# Altium PCB Battery Bank_PCB.PcbDoc (part 1 of 3)
Units mil, origin at the board's own origin, x right, y up, seen from the top; angles counter-clockwise.
Board outline 724.09 x 1004.05 mil, 4 copper layers (Top Layer, Layer 1, Layer 2, Bottom Layer), stack 28.803 mil thick; 96 components, 54 nets, 300 pads, 157 vias.
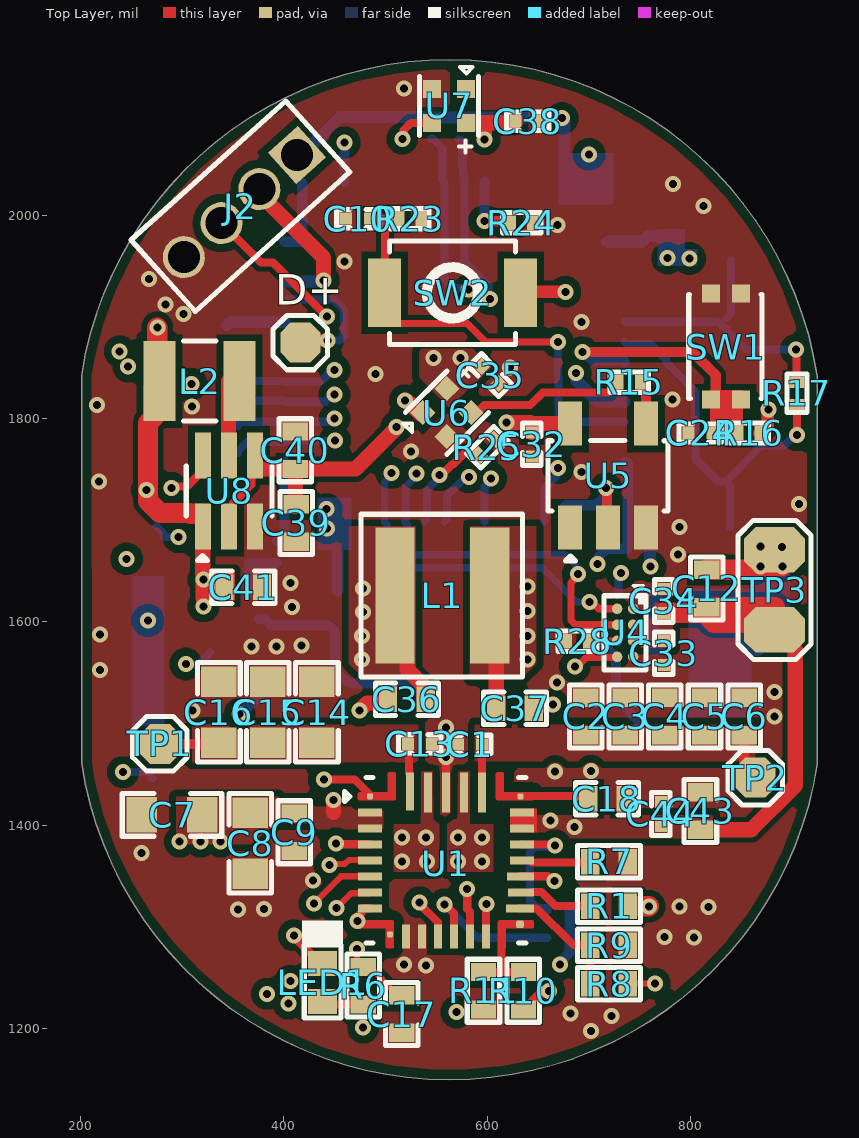
[diagram p0: Top Layer view]
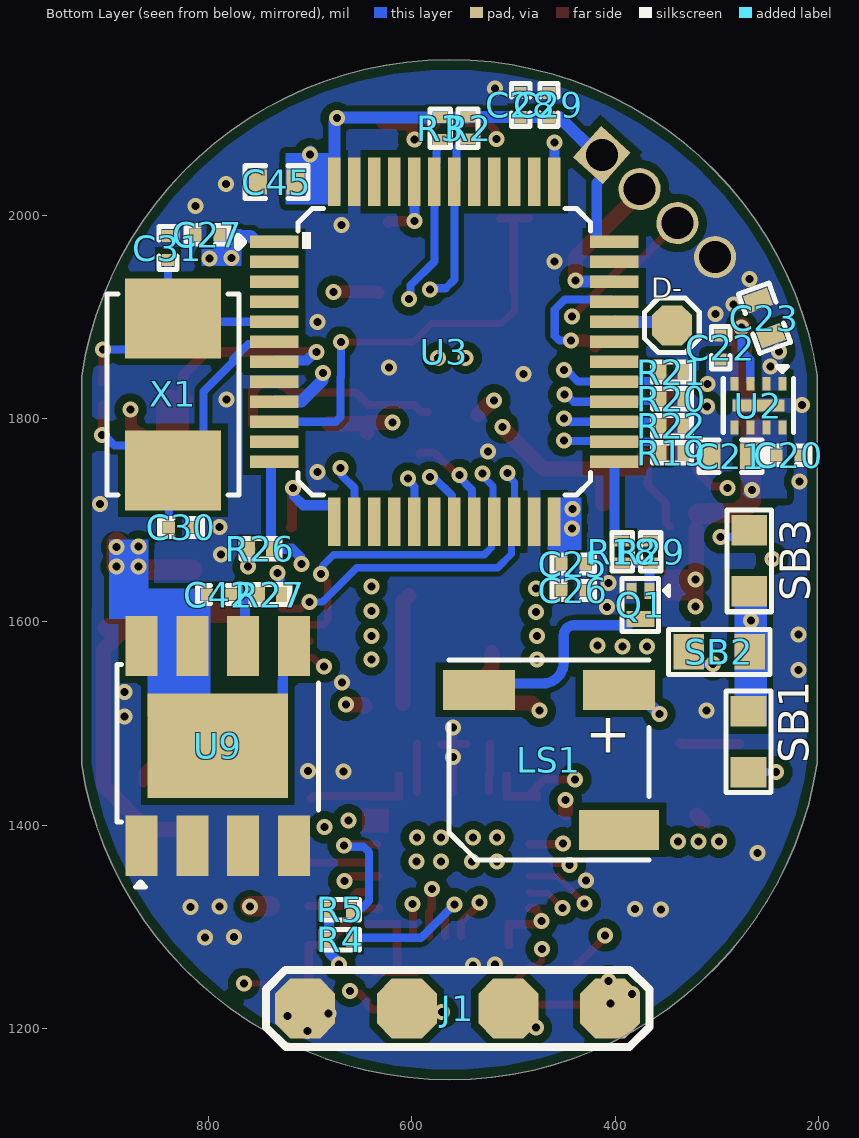
[diagram p1: Bottom Layer view, seen from below]
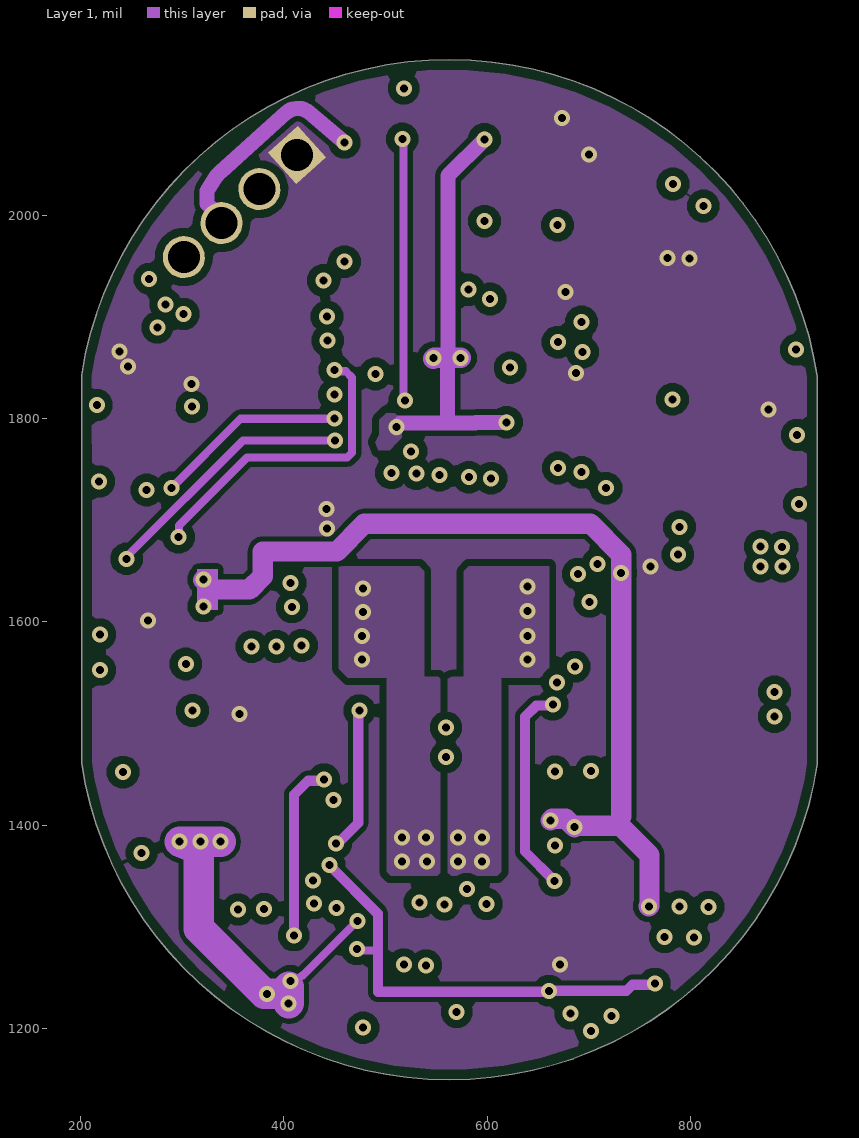
[diagram p2: Layer 1]
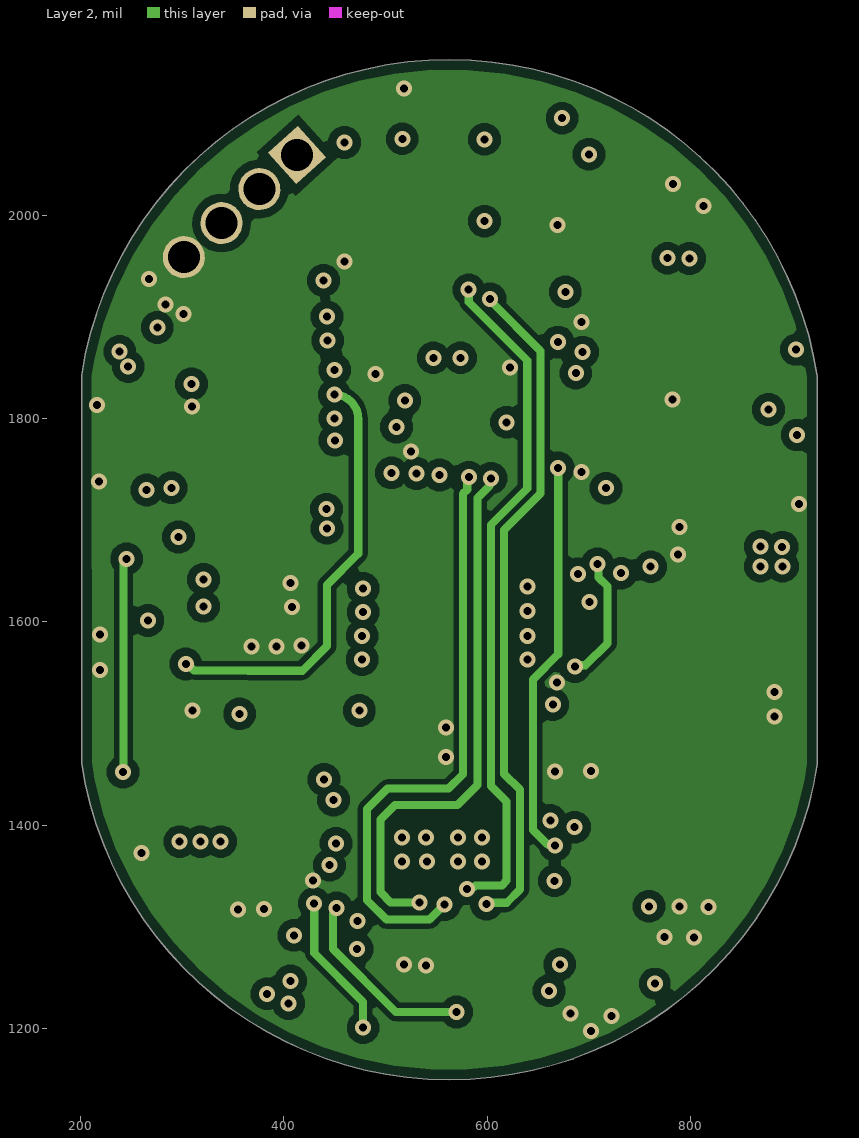
[diagram p3: Layer 2]
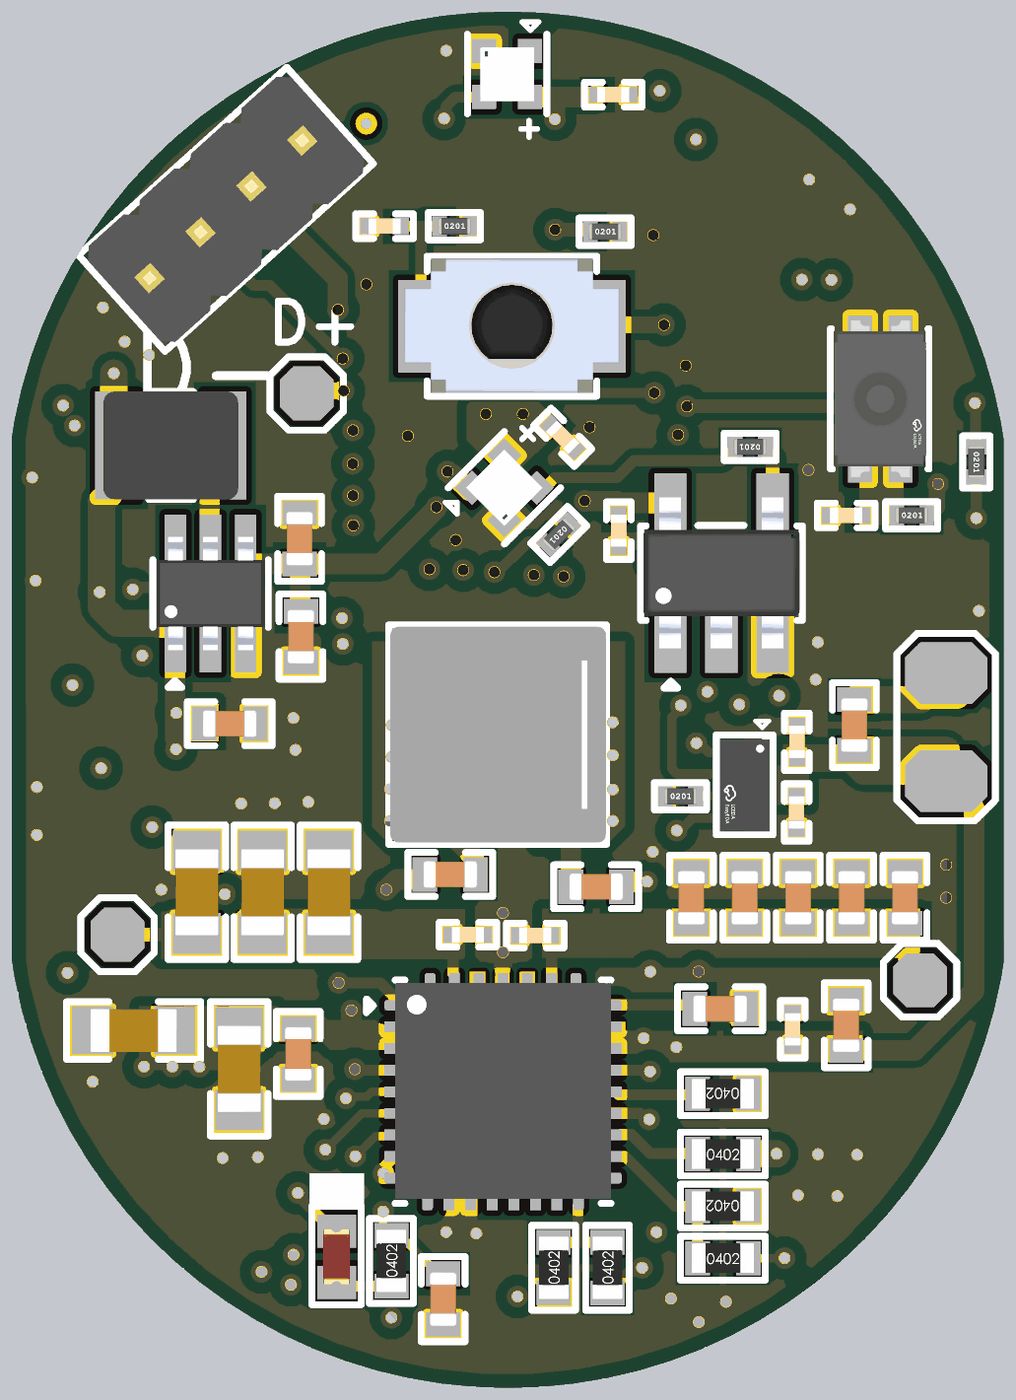
[diagram p5: 3D render of the assembled board from above, using the file's embedded part models]
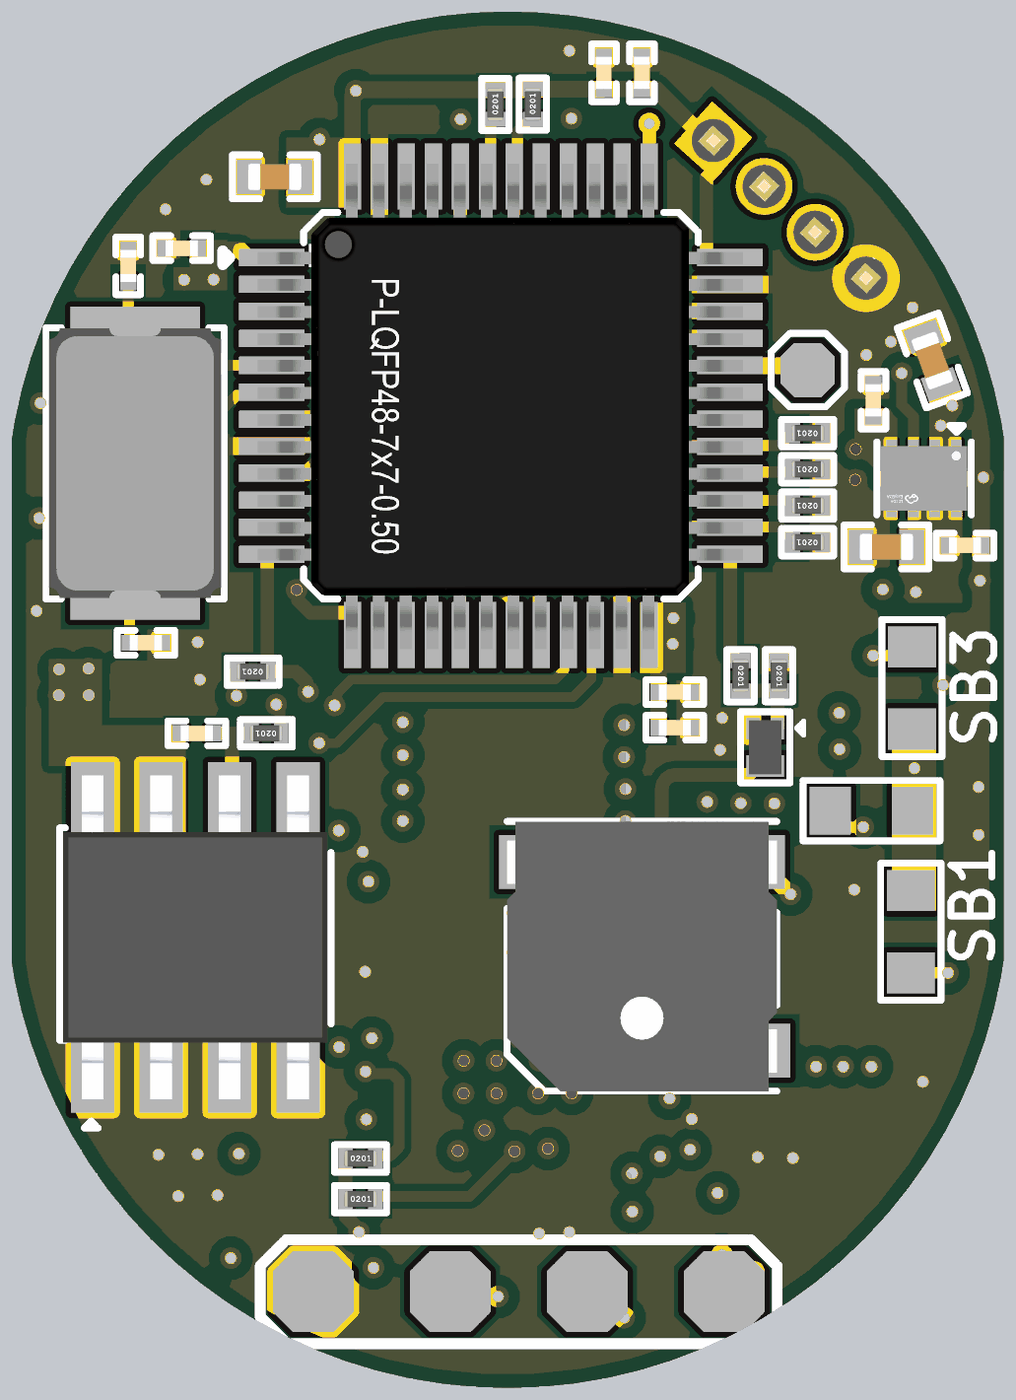
[diagram p6: 3D render of the assembled board from below, using the file's embedded part models]

## Layer stack, top to bottom
Top Solder: solder mask 0.4, Solder Resist, Dk 3.5
Top Layer: signal copper 1.378
Dielectric 2: prepreg 8.2835, PP-006, Dk 4.1
Layer 1: signal copper 0.5984
Dielectric 1: dielectric 8.2835, FR-4, Dk 4.8
Layer 2: signal copper 0.5984
Dielectric 3: prepreg 8.2835, PP-006, Dk 4.1
Bottom Layer: signal copper 1.378
Bottom Solder: solder mask 0.4, Solder Resist, Dk 3.5

## Board outline
201.03,1461.11 200.91,1842.93 cw(c562.81,1787.35) 924.87,1841.82 925,1460 cw(c563.1,1515.58)

## Design rules (kind name [scope] priority, off if disabled: settings)
BoardOutlineClearance [All] p1: gap=0 ignorepadtopadclearanceinfootprint=FALSE except(1: THPad-OutlineEdge THPad-CavityEdge THPad-CutoutEdge THPad-SplitBarrior THPad-SplitContinuation; 5: Via-OutlineEdge Via-CavityEdge Via-CutoutEdge Via-SplitBarrior Via-SplitContinuation; 10: Poly-OutlineEdge)
Clearance [All] p1: gap=10 ignorepadtopadclearanceinfootprint=TRUE except(0: Arc-Hole Track-Hole SMDPad-Hole THPad-Hole Via-Hole Fill-Hole Poly-Hole Region-Hole Text-Hole; 5: Arc-Arc Arc-Track Arc-SMDPad Arc-Via Arc-Poly Track-Track Track-SMDPad Track-Via Track-Poly SMDPad-SMDPad SMDPad-Region SMDPad-Text Fill-Poly; 6: SMDPad-Via SMDPad-Fill Via-Via Text-Text; 7: Arc-Fill Arc-Region Track-Fill Track-Region SMDPad-THPad SMDPad-Poly Fill-Fill Fill-Region Poly-Poly; 8: THPad-Via THPad-Poly Via-Poly)
MinimumSolderMaskSliver [All] p1: minsoldermaskwidth=1
PlaneConnect [All] p1: planeconnectstyle=Direct reliefexpansion=20 reliefentries=4 reliefconductorwidth=10 reliefairgap=10
PolygonConnect [All] p1: connectstyle=Direct reliefconductorwidth=10 reliefentries=4 polygonreliefangle="90 Angle" airgapwidth=10
RoutingVias [All] p1: holewidth=7.87 width=15.75 viastyle="Through Hole" minholewidth=7.87 minwidth=15.75 maxholewidth=7.87 maxwidth=15.75
SilkToSilkClearance [All] p1: silktosilkclearance=1
SilkToSolderMaskClearance [IsPad] p1: minsilkscreentomaskgap=1 clearancetoexposedcopper=TRUE
SolderMaskExpansion [All] p1: expansion=4 istentingtop=FALSE
Width [All] p1: maxlimit=30 minlimit=5 preferedwidth=10 midlayer1_minwidth=8 midlayer2_minwidth=8 minimp=50.000000 maximp=50.000000 favimp=50.000000
26 further rules are at their usual default settings.

## Classes and differential pairs
component class power_Sheet: C1 C2 C3 C4 C5 C6 C7 C8 C9 C12 C13 C14 C15 C16 C17 C18 C20 C21 C22 C23 C36 C37 C39 C40 C41 C42 C43 C44 J1 L1 L2 LED1 R1 R2 R3 R4 R5 R6 R7 R8 R9 R10 R11 R27 TP1 TP2 TP3 U1 U2 U8 U9
component class Controller_Sheet: C10 C24 C25 C26 C27 C28 C29 C30 C31 C32 C33 C34 C35 C38 C45 D+ D- J2 LS1 Q1 R15 R16 R17 R18 R19 R20 R21 R22 R23 R24 R25 R26 R28 R29 SB1 SB2 SB3 SW1 SW2 U3 U4 U5 U6 U7 X1

## Components (designator, comment, footprint, x,y, rotation, side; value= is the part's Value field where it differs from the comment)
C1 "0.1uF" CAP-0201 583,1479.5 r0 top
C2 "10uF" Cap-0402 697,1507 r270 top
C3 "10uF" Cap-0402 736,1507 r270 top
C4 "10uF" Cap-0402 775,1507 r270 top
C5 "10uF" Cap-0402 814,1507 r270 top
C6 "10uF" Cap-0402 853,1507 r270 top
C7 "10uF" CAP-0603 289.87,1410.11 r0 top
C8 "10uF" CAP-0603 366.92,1382.11 r90 top
C9 "100nF" cap-0402 410,1393 r90 top
C10 "1uF" CAP-0201 473,1997 r180 top
C12 "10uF" Cap-0402 816,1633 r270 top
C13 "0.1uF" CAP-0201 533.81,1480 r180 top
C14 "10uF" CAP-0603 432.5,1511 r270 top
C15 "10uF" CAP-0603 384,1511 r270 top
C16 "10uF" CAP-0603 336,1511 r270 top
C17 "4.7uF" Cap-0402 515.82,1214.09 r270 top
C18 "1nF" Cap-0402 718,1426 r180 top
C20 "2.2uF" CAP-0201 229.19,1764 r0 bottom
C21 "10uF" Cap-0402 286.5,1763 r180 bottom
C22 "2.2uF" CAP-0201 296,1870 r270 bottom
C23 "10uF" Cap-0402 253,1899 r250 bottom
C24 "1uF" CAP-0201 810,1786 r180 top
C25 "0.1uF" CAP-0201 441,1657 r0 bottom
C26 "0.1uF" CAP-0201 441,1631 r0 bottom
C27 "0.1uF" CAP-0201 801,1981 r180 bottom
C28 "0.1uF" CAP-0201 492.8,2108.91 r270 bottom
C29 "2.2uF" CAP-0201 465,2108.91 r90 bottom
C30 "30pF" Cap-0201 827.13,1693 r0 bottom
C31 "30pF" Cap-0201 840,1968.06 r270 bottom
C32 "0.1uF" CAP-0201 644,1774.81 r90 top
C33 "0.1uF" CAP-0201 773.88,1569.26 r270 top
C34 "1uF" CAP-0201 774,1620.74 r90 top
C35 "0.1uF" CAP-0201 603,1843 r135 top
C36 "47nF" Cap-0402 521,1524 r0 top
C37 "47nF" Cap-0402 627.5,1515 r0 top
C38 "0.1uF" CAP-0201 640,2093 r180 top
C39 "4.7uF" Cap-0402 412,1697.5 r90 top
C40 "4.7uF" Cap-0402 411,1769 r90 top
C41 "10uF" Cap-0402 360,1634 r180 top
C42 "0.1uF" CAP-0201 790,1627 r180 bottom
C43 "10uF" Cap-0402 810,1414 r270 top
C44 "0.1uF" CAP-0201 771,1411 r270 top
C45 "4.7uF" Cap-0402 733,2033 r180 bottom
D+ "TEST POINT 0.5mm Dia" "Test-point - 0.5mm" 416.19,1874.95 r0 top
D- "TEST POINT 0.5mm Dia" "Test-point - 0.5mm" 344,1892 r180 bottom
J1 "4 Pin SMD Wire Connector" "4 Pin SMD Wire CON." 404.97,1219.55 r0 bottom
J2 "ZX-PZ1.27-1-4PZZ" ZX-PZ1.27-1-4PZZ 357.21,2009.31 r222 top
L1 "1uH" XFL4020-102MEC 556,1626 r0 top
L2 "4.7uH" SLO252012F4R7MTT 317,1837 r0 top
LED1 "Green" LED-0402 438,1245 r90 top
LS1 "FUET-5025" FUET-5025 465,1464.27 r0 bottom
Q1 "RV2C010UNT2L" DFN1006-3 375,1616.78 r0 bottom
R1 "100R" Res-0402 720,1320 r0 top
R2 "4.7K" Res-0201 544.68,2086.09 r90 bottom
R3 "4.7K" Res-0201 572,2085.83 r90 bottom
R4 "10K" Res-0201 670.43,1287.13 r180 bottom
R5 "10K" Res-0201 670.43,1316.72 r180 bottom
R6 "2.2K" Res-0402 478,1242 r90 top
R7 "3K" Res-0402 720,1364 r180 top value=3kR
R8 "137K" Res-0402 720,1244 r0 top value=137kR
R9 "100K" Res-0402 720,1282 r180 top
R10 "5.23K" Res-0402 635.78,1237 r90 top value=5.23kR
R11 "30.1K" Res-0402 596.46,1237 r90 top
R15 "499R" Res-0201 740,1836 r180 top
R16 "10K" Res-0201 857.83,1786 r0 top
R17 "1M" Res-0201 905,1825 r270 top value=1MR
R18 "100R" Res-0201 393,1669 r270 bottom
R19 "10K" Res-0201 344,1766.42 r0 bottom
R20 "10K" Res-0201 344,1819.67 r0 bottom
R21 "10K" Res-0201 344,1846 r0 bottom
R22 "10K" Res-0201 344,1793.1 r0 bottom
R23 "5.1K" Res-0201 524,1997 r0 top value=5.1kR
R24 "10K" Res-0201 634,1993 r0 top
R25 "10K" Res-0201 600.18,1772.02 r225 top
R26 "10K" Res-0201 749,1672 r0 bottom
R27 "1K" Res-0201 739.17,1627 r0 bottom value=1kR
R28 "10K" Res-0201 689,1581 r0 top
R29 "10K" Res-0201 365,1669 r270 bottom
SB1 "Solder Bridge 0603" "Solder Bridge" 268.65,1482.17 r270 bottom
SB2 "Solder Bridge 0603" "Solder Bridge" 297.47,1570.48 r0 bottom
SB3 "Solder Bridge 0603" "Solder Bridge" 267.87,1660.06 r90 bottom
SW1 "HX TS152605A" "HX TS152605A 160gf" 835,1871 r90 top
SW2 "B3U-1000P" B3U-1000P 566,1924 r180 top
TP1 "TEST POINT 0.5mm Dia" "Test-point - 0.5mm" 278,1480 r90 top
TP2 "TEST POINT 0.5mm Dia" "Test-point - 0.5mm" 864,1446.77 r90 top
TP3 "2 Test Pad" "2 Test Pad" 883,1592.26 r90 top
U1 "BQ25792RQMR" "29-VQFN-HR (4x4)" 559.5,1362 r0 top
U2 "LD56100DPU33R" DFN-8(1.2x1.6) 259,1813 r270 bottom
U3 "STM32F103C8T6" "48-LQFP (7x7)_" 568,1866 r180 bottom
U4 "MAX17048X+T10" "8-WLP (1.66x0.92)" 735.87,1589.38 r270 top
U5 "SN74LV1T34DBVR" SOT-23-5 719,1744 r90 top
U6 "XL-1010RGBC-WS2812B" XL-1010RGBC-WS2812B 560.52,1806.12 r45 top
U7 "XL-1010RGBC-WS2812B" XL-1010RGBC-WS2812B 562.52,2108 r270 top
U8 "TPS61222DCKR" SC-70-6 346,1729 r90 top
U9 "XB8886A" 8-SO-EP_ 791,1478 r90 bottom
X1 "8MHz" 0153G2-8.000F20DTNJL 835,1824 r270 bottom

## Footprints (in the part's own frame and the unit in brackets; to place one, negate y for a bottom-side part, rotate by r counter-clockwise, add the part's x,y. Pads: shape width x height; smd on the part's side, far side on the other; paste and mask are expansions set on the pad)
"2 Test Pad" [mil]
  oct 45x60 smd: 1(0,0) 2(78.74,0)
  silkscreen extent -29,-36 108,36
"4 Pin SMD Wire CON." [mm]
  oct 1.5x1.5 smd: 1(0,0) 2(2.54,0) 3(5.08,0) 4(7.62,0)
  silkscreen extent -0.98,-0.97 8.6,0.97
8-SO-EP_ [mm]
  rect 1.505x0.802 smd: 1(-2.497,1.905) 2(-2.497,0.635) 3(-2.497,-0.635) 4(-2.497,-1.905) 5(2.498,-1.905) 6(2.498,-0.635) 7(2.498,0.635) 8(2.498,1.905)
  rect 2.613x3.502 smd: 9(0,0)
  silkscreen extent -3.53,-2.51 2.03,2.51, body extent -3,-2.45 3,2.45, height 1.7
"8-WLP (1.66x0.92)" [mm]
  round 0.26 smd paste-100 mask+0.051: A1(-0.6,0.2) A2(-0.2,0.2) A3(0.2,0.2) A4(0.6,0.2) B1(-0.6,-0.2) B2(-0.2,-0.2) B3(0.2,-0.2) B4(0.6,-0.2)
  silkscreen extent -1.18,-0.53 0.93,0.53, body extent -0.84,-0.46 0.84,0.46, height 0.58
"29-VQFN-HR (4x4)" [mm]
  rrect50% 0.15x0.15 smd: 1(-1.9,1.687) 9(-1.4,-1.762) 24(1.863,1.687)
  rect 0.6x0.2 smd: 2(-1.9,1.288) 3(-1.9,0.888) 4(-1.9,0.487) 5(-1.9,0.088) 6(-1.9,-0.312) 7(-1.9,-0.713) 8(-1.9,-1.112) 20(1.9,0.088) 21(1.9,0.487) 22(1.9,0.888) 23(1.9,1.288)
  rect 0.2x0.6 smd: 10(-1,-1.812) 11(-0.6,-1.812) 12(-0.2,-1.812) 13(0.2,-1.812) 14(0.6,-1.812) 15(1,-1.812)
  rrect50% 0.19x0.19 smd: 16(1.85,-1.512)
  rect 0.7x0.2 smd: 17(1.85,-1.112)
  rect 0.65x0.2 smd: 18(1.875,-0.713)
  rect 0.68x0.2 smd: 19(1.863,-0.312)
  rect 0.2x1 smd: 25(0.9,1.787) 26(0.45,1.787) 27(0,1.787) 28(-0.45,1.787)
  rect 0.2x0.95 smd: 29(-0.9,1.813)
  Top Layer region: -1.292,2.287 -1.29,2.287 -1.287,2.285 -1.285,2.285 -1.282,2.285 -1.28,2.284 -1.277,2.282 -1.275,2.281 -1.273,2.28 -1.271,2.278 -1.269,2.277 -1.267,2.275 -1.265,2.272 -1.263,2.271 -1.261,2.268 -1.26,2.267 -1.258,2.265 -1.257,2.262 -1.255,2.261 -1.254,2.258 -1.253,2.255 -1.252,2.252 -1.252,2.251 -1.251,2.248 -1.251,2.245 -1.25,2.242 -1.25,2.241 -1.25,2.238 -1.25,1.637 -1.25,1.635 -1.25,1.633 -1.251,1.63 -1.251,1.627 -1.252,1.625 -1.252,1.623 -1.253,1.62 -1.254,1.617 -1.255,1.615 -1.257,1.613 -1.258,1.61 -1.26,1.609 -1.261,1.606 -1.263,1.605 -1.265,1.603 -1.267,1.6 -1.269,1.599 -1.271,1.597 -1.273,1.596 -1.275,1.595 -1.277,1.593 -1.28,1.592 -1.282,1.59 -1.285,1.59 -1.287,1.59 -1.29,1.589 -1.292,1.589 -1.295,1.587 -2.155,1.587 -2.158,1.589 -2.16,1.589 -2.163,1.59 -2.165,1.59 -2.168,1.59 -2.17,1.592 -2.173,1.593 -2.175,1.595 -2.177,1.596 -2.179,1.597 -2.181,1.599 -2.183,1.6 -2.185,1.603 -2.187,1.605 -2.189,1.606 -2.19,1.609 -2.192,1.61 -2.193,1.613 -2.195,1.615 -2.196,1.617 -2.197,1.62 -2.198,1.623 -2.198,1.625 -2.199,1.627 -2.199,1.63 -2.2,1.633 -2.2,1.635 -2.2,1.637 -2.2,1.737 -2.2,1.74 -2.2,1.743 -2.199,1.746 -2.199,1.747 -2.198,1.75 -2.198,1.753 -2.197,1.756 -2.196,1.757 -2.195,1.76 -2.193,1.763 -2.192,1.764 -2.19,1.767 -2.189,1.769 -2.187,1.77 -2.185,1.773 -2.183,1.774 -2.181,1.777 -2.179,1.777 -2.177,1.78 -2.175,1.78 -2.173,1.783 -2.17,1.784 -2.168,1.784 -2.165,1.786 -2.163,1.786 -2.16,1.787 -2.158,1.787 -2.155,1.787 -1.45,1.787 -1.45,2.238 -1.45,2.241 -1.45,2.242 -1.449,2.245 -1.449,2.248 -1.448,2.251 -1.448,2.252 -1.447,2.255 -1.446,2.258 -1.445,2.261 -1.443,2.262 -1.442,2.265 -1.44,2.267 -1.439,2.268 -1.437,2.271 -1.435,2.272 -1.433,2.275 -1.431,2.277 -1.429,2.278 -1.427,2.28 -1.425,2.281 -1.423,2.282 -1.42,2.284 -1.418,2.285 -1.415,2.285 -1.413,2.285 -1.41,2.287 -1.408,2.287 -1.405,2.288 -1.295,2.288
  Top Layer region: 1.408,2.287 1.41,2.287 1.413,2.285 1.415,2.285 1.418,2.285 1.42,2.284 1.423,2.282 1.425,2.281 1.427,2.28 1.429,2.278 1.431,2.277 1.433,2.275 1.435,2.272 1.437,2.271 1.439,2.268 1.44,2.267 1.442,2.265 1.443,2.262 1.445,2.261 1.446,2.258 1.447,2.255 1.448,2.252 1.448,2.251 1.449,2.248 1.449,2.245 1.45,2.242 1.45,2.241 1.45,2.238 1.45,1.787 2.155,1.787 2.158,1.787 2.16,1.787 2.163,1.786 2.165,1.786 2.168,1.784 2.17,1.784 2.173,1.783 2.175,1.78 2.177,1.78 2.179,1.777 2.181,1.777 2.183,1.774 2.185,1.773 2.187,1.77 2.189,1.769 2.19,1.767 2.192,1.764 2.193,1.763 2.195,1.76 2.196,1.757 2.197,1.756 2.198,1.753 2.198,1.75 2.199,1.747 2.199,1.746 2.2,1.743 2.2,1.74 2.2,1.737 2.2,1.637 2.2,1.635 2.2,1.633 2.199,1.63 2.199,1.627 2.198,1.625 2.198,1.623 2.197,1.62 2.196,1.617 2.195,1.615 2.193,1.613 2.192,1.61 2.19,1.609 2.189,1.606 2.187,1.605 2.185,1.603 2.183,1.6 2.181,1.599 2.179,1.597 2.177,1.596 2.175,1.595 2.173,1.593 2.17,1.592 2.168,1.59 2.165,1.59 2.163,1.59 2.16,1.589 2.158,1.589 2.155,1.587 1.295,1.587 1.292,1.589 1.29,1.589 1.287,1.59 1.285,1.59 1.282,1.59 1.28,1.592 1.277,1.593 1.275,1.595 1.273,1.596 1.271,1.597 1.269,1.599 1.267,1.6 1.265,1.603 1.263,1.605 1.261,1.606 1.26,1.609 1.258,1.61 1.257,1.613 1.255,1.615 1.254,1.617 1.253,1.62 1.252,1.623 1.252,1.625 1.251,1.627 1.251,1.63 1.25,1.633 1.25,1.635 1.25,1.637 1.25,2.238 1.25,2.241 1.25,2.242 1.251,2.245 1.251,2.248 1.252,2.251 1.252,2.252 1.253,2.255 1.254,2.258 1.255,2.261 1.257,2.262 1.258,2.265 1.26,2.267 1.261,2.268 1.263,2.271 1.265,2.272 1.267,2.275 1.269,2.277 1.271,2.278 1.273,2.28 1.275,2.281 1.277,2.282 1.28,2.284 1.282,2.285 1.285,2.285 1.287,2.285 1.29,2.287 1.292,2.287 1.295,2.288 1.405,2.288
  Top Layer region: -1.342,-1.413 -1.34,-1.413 -1.337,-1.415 -1.335,-1.415 -1.332,-1.415 -1.33,-1.416 -1.327,-1.418 -1.325,-1.419 -1.323,-1.421 -1.321,-1.422 -1.319,-1.423 -1.317,-1.425 -1.315,-1.428 -1.313,-1.429 -1.311,-1.431 -1.31,-1.433 -1.308,-1.435 -1.307,-1.438 -1.305,-1.439 -1.304,-1.442 -1.303,-1.445 -1.302,-1.448 -1.302,-1.449 -1.301,-1.452 -1.301,-1.455 -1.3,-1.458 -1.3,-1.459 -1.3,-1.462 -1.3,-2.063 -1.3,-2.066 -1.3,-2.067 -1.301,-2.07 -1.301,-2.073 -1.302,-2.076 -1.302,-2.077 -1.303,-2.08 -1.304,-2.083 -1.305,-2.086 -1.307,-2.087 -1.308,-2.09 -1.31,-2.091 -1.311,-2.093 -1.313,-2.095 -1.315,-2.097 -1.317,-2.1 -1.319,-2.101 -1.321,-2.103 -1.323,-2.104 -1.325,-2.105 -1.327,-2.107 -1.33,-2.108 -1.332,-2.11 -1.335,-2.11 -1.337,-2.11 -1.34,-2.111 -1.342,-2.111 -1.345,-2.113 -1.455,-2.113 -1.458,-2.111 -1.46,-2.111 -1.463,-2.11 -1.465,-2.11 -1.468,-2.11 -1.47,-2.108 -1.473,-2.107 -1.475,-2.105 -1.477,-2.104 -1.479,-2.103 -1.481,-2.101 -1.483,-2.1 -1.485,-2.097 -1.487,-2.095 -1.489,-2.093 -1.49,-2.091 -1.492,-2.09 -1.493,-2.087 -1.495,-2.086 -1.496,-2.083 -1.497,-2.08 -1.498,-2.077 -1.498,-2.076 -1.499,-2.073 -1.499,-2.07 -1.5,-2.067 -1.5,-2.066 -1.5,-2.063 -1.5,-1.612 -2.155,-1.612 -2.158,-1.612 -2.16,-1.612 -2.163,-1.61 -2.165,-1.61 -2.168,-1.609 -2.17,-1.609 -2.173,-1.607 -2.175,-1.605 -2.177,-1.605 -2.179,-1.602 -2.181,-1.602 -2.183,-1.599 -2.185,-1.597 -2.187,-1.595 -2.189,-1.593 -2.19,-1.592 -2.192,-1.589 -2.193,-1.587 -2.195,-1.585 -2.196,-1.582 -2.197,-1.58 -2.198,-1.578 -2.198,-1.575 -2.199,-1.572 -2.199,-1.57 -2.2,-1.568 -2.2,-1.565 -2.2,-1.562 -2.2,-1.462 -2.2,-1.459 -2.2,-1.458 -2.199,-1.455 -2.199,-1.452 -2.198,-1.449 -2.198,-1.448 -2.197,-1.445 -2.196,-1.442 -2.195,-1.439 -2.193,-1.438 -2.192,-1.435 -2.19,-1.433 -2.189,-1.431 -2.187,-1.429 -2.185,-1.428 -2.183,-1.425 -2.181,-1.423 -2.179,-1.422 -2.177,-1.421 -2.175,-1.419 -2.173,-1.418 -2.17,-1.416 -2.168,-1.415 -2.165,-1.415 -2.163,-1.415 -2.16,-1.413 -2.158,-1.413 -2.155,-1.412 -1.345,-1.412
  Top Layer region: 2.158,-1.413 2.16,-1.413 2.163,-1.415 2.165,-1.415 2.168,-1.415 2.17,-1.416 2.173,-1.418 2.175,-1.419 2.177,-1.421 2.179,-1.422 2.181,-1.423 2.183,-1.425 2.185,-1.428 2.187,-1.429 2.189,-1.431 2.19,-1.433 2.192,-1.435 2.193,-1.438 2.195,-1.439 2.196,-1.442 2.197,-1.445 2.198,-1.448 2.198,-1.449 2.199,-1.452 2.199,-1.455 2.2,-1.458 2.2,-1.459 2.2,-1.462 2.2,-1.562 2.2,-1.565 2.2,-1.568 2.199,-1.57 2.199,-1.572 2.198,-1.575 2.198,-1.578 2.197,-1.58 2.196,-1.582 2.195,-1.585 2.193,-1.587 2.192,-1.589 2.19,-1.592 2.189,-1.593 2.187,-1.595 2.185,-1.597 2.183,-1.599 2.181,-1.602 2.179,-1.602 2.177,-1.605 2.175,-1.605 2.173,-1.607 2.17,-1.609 2.168,-1.609 2.165,-1.61 2.163,-1.61 2.16,-1.612 2.158,-1.612 2.155,-1.612 1.5,-1.612 1.5,-2.063 1.5,-2.066 1.5,-2.067 1.499,-2.07 1.499,-2.073 1.498,-2.076 1.498,-2.077 1.497,-2.08 1.496,-2.083 1.495,-2.086 1.493,-2.087 1.492,-2.09 1.49,-2.091 1.489,-2.093 1.487,-2.095 1.485,-2.097 1.483,-2.1 1.481,-2.101 1.479,-2.103 1.477,-2.104 1.475,-2.105 1.473,-2.107 1.47,-2.108 1.468,-2.11 1.465,-2.11 1.463,-2.11 1.46,-2.111 1.458,-2.111 1.455,-2.113 1.345,-2.113 1.342,-2.111 1.34,-2.111 1.337,-2.11 1.335,-2.11 1.332,-2.11 1.33,-2.108 1.327,-2.107 1.325,-2.105 1.323,-2.104 1.321,-2.103 1.319,-2.101 1.317,-2.1 1.315,-2.097 1.313,-2.095 1.311,-2.093 1.31,-2.091 1.308,-2.09 1.307,-2.087 1.305,-2.086 1.304,-2.083 1.303,-2.08 1.302,-2.077 1.302,-2.076 1.301,-2.073 1.301,-2.07 1.3,-2.067 1.3,-2.066 1.3,-2.063 1.3,-1.462 1.3,-1.459 1.3,-1.458 1.301,-1.455 1.301,-1.452 1.302,-1.449 1.302,-1.448 1.303,-1.445 1.304,-1.442 1.305,-1.439 1.307,-1.438 1.308,-1.435 1.31,-1.433 1.311,-1.431 1.313,-1.429 1.315,-1.428 1.317,-1.425 1.319,-1.423 1.321,-1.422 1.323,-1.421 1.325,-1.419 1.327,-1.418 1.33,-1.416 1.332,-1.415 1.335,-1.415 1.337,-1.415 1.34,-1.413 1.342,-1.413 1.345,-1.412 2.155,-1.412
  silkscreen extent -2.53,-1.98 2,2.16, body extent -2,-1.9 2,2.1, height 1
"48-LQFP (7x7)_" [mm]
  rect 1.22x0.32 smd: 1(-4.25,2.75) 2(-4.25,2.25) 3(-4.25,1.75) 4(-4.25,1.25) 5(-4.25,0.75) 6(-4.25,0.25) 7(-4.25,-0.25) 8(-4.25,-0.75) 9(-4.25,-1.25) 10(-4.25,-1.75) 11(-4.25,-2.25) 12(-4.25,-2.75) 25(4.25,-2.75) 26(4.25,-2.25) 27(4.25,-1.75) 28(4.25,-1.25) 29(4.25,-0.75) 30(4.25,-0.25) 31(4.25,0.25) 32(4.25,0.75) 33(4.25,1.25) 34(4.25,1.75) 35(4.25,2.25) 36(4.25,2.75)
  rect 0.32x1.22 smd: 13(-2.75,-4.25) 14(-2.25,-4.25) 15(-1.75,-4.25) 16(-1.25,-4.25) 17(-0.75,-4.25) 18(-0.25,-4.25) 19(0.25,-4.25) 20(0.75,-4.25) 21(1.25,-4.25) 22(1.75,-4.25) 23(2.25,-4.25) 24(2.75,-4.25) 37(2.75,4.25) 38(2.25,4.25) 39(1.75,4.25) 40(1.25,4.25) 41(0.75,4.25) 42(0.25,4.25) 43(-0.25,4.25) 44(-0.75,4.25) 45(-1.25,4.25) 46(-1.75,4.25) 47(-2.25,4.25) 48(-2.75,4.25)
  silkscreen extent -5.16,-3.58 3.66,3.58, body extent -4.51,-4.51 4.49,4.49, height 1.43
0153G2-8.000F20DTNJL [mm]
  rect 2x2.4 smd: 1(-1.9,0) 2(1.9,0)
  silkscreen extent -2.51,-1.65 2.51,1.65, body extent -2.5,-1.6 2.5,1.6, height 1.5
B3U-1000P [mm] "SWITCH TACTILE SPST-NO 0.05A 12V"
  rect 0.82x1.72 smd: 1(-1.7,0) 2(1.7,0)
  silkscreen extent -1.57,-1.3 1.57,1.3, body extent -2,-1.26 2,1.24, height 1.6
CAP-0201 [mm]
  rect 0.3x0.3 smd mask+0.055: 1(-0.3,0) 2(0.3,0)
  silkscreen extent -0.53,-0.23 0.53,0.23, body extent -0.3,-0.15 0.3,0.15, height 0.28
Cap-0201 [mm]
  rect 0.3x0.3 smd mask+0.055: 1(-0.3,0) 2(0.3,0)
  silkscreen extent -0.53,-0.23 0.53,0.23, body extent -0.3,-0.15 0.3,0.15, height 0.28
Cap-0402 [mil]
  rect 18x25 smd mask+2.36: 1(-18.5,0) 2(18.5,0)
  silkscreen extent -31,-16 31,16, body extent -20,-10 20,10, height 19
cap-0402 [mil]
  rect 18x25 smd mask+2.36: 1(-18.5,0) 2(18.5,0)
  silkscreen extent -31,-16 31,16, body extent -20,-10 20,10, height 19
CAP-0603 [mil]
  rect 30x35 smd mask+2.36: 1(-30,0) 2(30,0)
  silkscreen extent -49,-21 49,21, body extent -32,-16 31,16, height 34
DFN1006-3 [mm]
  rect 0.25x0.4 smd: 1(-0.225,-0.35) 2(0.225,-0.35)
  rect 0.7x0.4 smd: 3(0,0.35)
  silkscreen extent -0.71,-0.66 0.46,0.66, body extent -0.3,-0.5 0.3,0.5, height 0.53
DFN-8(1.2x1.6) [mm]
  rect 0.345x0.2 smd paste+0 mask+0.051: 1(-0.547,0.6) 2(-0.547,0.2) 3(-0.547,-0.2) 4(-0.547,-0.6) 5(0.547,-0.6) 6(0.547,-0.2) 7(0.547,0.2) 8(0.547,0.6)
  rect 0.3x1.3 smd paste+0 mask+0.051: 9(0,0)
  silkscreen extent -0.98,-0.88 0.68,0.88, body extent -0.61,-0.81 0.61,0.81, height 0.4
FUET-5025 [mm]
  rect 1.8x1 smd: 1(-1.75,-1.75) 2(1.75,-1.75)
  rect 2x1 smd: 3(-1.75,1.75)
  silkscreen extent -2.5,-2.5 2.5,2.5, body extent -2.5,-2.5 2.5,2.51, height 2.51
"HX TS152605A 160gf" [mm]
  rect 0.45x0.45 smd: 1(-1.325,-0.375) 1(-1.325,0.375) 2(1.325,-0.375) 2(1.325,0.375)
  silkscreen extent -1.3,-0.9 1.3,0.93, body extent -1.45,-0.85 1.45,0.85, height 0.55
LED-0402 [mm]
  rect 0.62x0.72 smd: 1(-0.475,0) 2(0.475,0)
  silkscreen extent -0.89,-0.51 1.55,0.51, body extent -0.5,-0.25 0.51,0.25, height 0.45
Res-0201 [mm]
  rect 0.27x0.37 smd mask+0.055: 1(-0.275,0) 2(0.275,0)
  silkscreen extent -0.48,-0.25 0.48,0.25, body extent -0.3,-0.15 0.3,0.15, height 0.29
Res-0402 [mil]
  rect 18x25 smd mask+2.17: 1(-18.5,0) 2(18.5,0)
  silkscreen extent -32,-17 32,16, body extent -23,-11 23,11, height 16
SC-70-6 [mm]
  rect 1.15x0.4 smd: 1(-0.89,0.65) 2(-0.89,0) 3(-0.89,-0.65) 4(0.89,-0.65) 5(0.89,0) 6(0.89,0.65)
  silkscreen extent -1.74,-1.07 0.63,1.07, body extent -1.05,-1 1.05,1, height 1.1
SLO252012F4R7MTT [mm]
  rect 0.8x2 smd: 1(-1,0) 2(1,0)
  silkscreen extent -0.41,-1 0.42,1, body extent -1.25,-1 1.25,1, height 1.2
"Solder Bridge" [mil] "Solder Bridge ON"
  rect 30x35 smd: 1(-30,0) 2(30,0)
  silkscreen extent -50,-22 50,22
SOT-23-5 [mm]
  rect 1.1x0.6 smd: 1(-1.3,0.95) 2(-1.3,0) 3(-1.3,-0.95) 4(1.3,-0.95) 5(1.3,0.95)
  silkscreen extent -2.13,-1.5 0.88,1.5, body extent -1.4,-1.45 1.4,1.45, height 1.45
"Test-point - 0.5mm" [mm]
  oct 1x1 smd: 1(0,0)
  silkscreen extent -0.68,-0.68 0.68,0.68
XFL4020-102MEC [mm]
  rect 0.98x3.4 smd: 1(-1.185,0) 2(1.185,0)
  silkscreen extent -2.03,-2.03 2.01,2.03, body extent -2,-2 2,2, height 2.1
XL-1010RGBC-WS2812B [mm]
  rect 0.45x0.45 smd: 1(-0.425,0.425) 2(0.425,0.425) 3(-0.425,-0.425) 4(0.425,-0.425)
  silkscreen extent -0.97,-0.74 1.17,0.74, body extent -0.5,-0.5 0.5,0.5, height 0.81
ZX-PZ1.27-1-4PZZ [mm]
  rect 1x1.05 hole 0.8: 1(-1.905,0)
  round 1.05 hole 0.8: 2(-0.635,0) 3(0.635,0) 4(1.905,0)
  silkscreen extent -2.6,-1.2 2.6,1.2, body extent -2.54,-1.2 2.54,1.2, height 5.6

## Part data
C1 C13 C25 C26 C27 C28 C32 C33 C35 C38 C42 C44: library part GRM033C81E104KE14D, "CAP CER 0.1UF 25V X6S 0201", Capacitance=100nF, Case Code (Imperial)=0201, Case Code (Metric)=0603, Dielectric=X6S, Manufacturer=Murata, Max Operating Temperature=105°C, Min Operating Temperature=-55°C, Package Quantity=15000, Supplier Part Number 1=490-10403-1-ND, Tolerance=10%, Voltage Rating=25V, Case/Package=0201, Category="Ceramic Capacitors", ComponentLink1Description=http://www.mouser.com/ds/2/281/c02e-2905.pdf?src-supplier=Mouser, ComponentLink1URL=http://www.mouser.com/ds/2/281/c02e-2905.pdf?src-supplier=Mouser, ComponentLink2Description=http://www.farnell.com/datasheets/2722733.pdf?src-supplier=Farnell, ComponentLink2URL=http://www.farnell.com/datasheets/2722733.pdf?src-supplier=Farnell, ComponentLink3Description=http://search.murata.co.jp/Ceramy/image/img/A01X/G101/ENG/GRM033C81E104KE14-01.pdf?src-supplier=Digi-Key, ComponentLink3URL=http://search.murata.co.jp/Ceramy/image/img/A01X/G101/ENG/GRM033C81E104KE14-01.pdf?src-supplier=Digi-Key, Height=0.3mm, Length=0.024inch, Manufacturer Part Number=GRM033C81E104KE14D, Mount="Surface Mount", Packaging="Tape and Reel", Pricing 1="1=0.10000, 10=0.05100, 50=0.02780, 100=0.02260, 500=0.01616, 1000=0.01270, 2500=0.01155, 5000=0.01063 (USD)", RoHS=Yes, RoHS Compliant=Yes, Stock 1=91, Supplier 1=Digi-Key, Termination=SMD/SMT, Thickness=0.013inch, Voltage Rating (DC)=25V, Weight=1.2E-05oz, Width=0.3mm
C2 C3 C4 C5 C6 C21 C23 C41 C43: library part CC0402MRX5R6BB106, "CAP CER 10UF 10V X5R 0402", Case Code (Imperial)=0402, Case Code (Metric)=1005, LCSC Part Number=C962143, Manufacturer=Yageo, Max Operating Temperature=85°C, Min Operating Temperature=-55°C, Supplier Part Number 1=6097631, Tolerance=20%, Voltage Rating=10V, Capacitance=10uF, Case/Package=0402, Category="Ceramic Capacitors", ComponentLink1Description=http://www.yageo.com/documents/recent/UPY-GPHC_X5R_4V-to-50V_25.pdf?src-supplier=Digi-Key, ComponentLink1URL=http://www.yageo.com/documents/recent/UPY-GPHC_X5R_4V-to-50V_25.pdf?src-supplier=Digi-Key, Item Type=Capacitor, Manufacturer Part Number=CC0402MRX5R6BB106, Mount="Surface Mount", Packaging="Tape and Reel", Pricing 1="10000=0.02650, 20000=0.02590, 30000=0.02550, 40000=0.02530, 50000=0.02450 (USD)", RoHS=Yes, RoHS Compliant=Yes, Stock 1=80000, Supplier 1="Future Electronics"
C7 C8 C14 C15 C16: library part TMK107BBJ106MA-T, "CAP CER 10UF 25V X5R 0603", Case Code (Imperial)=0603, Case Code (Metric)=1608, LCSC Part Number=C386081, Manufacturer="Taiyo Yuden", Max Operating Temperature=85°C, Min Operating Temperature=-55°C, Supplier Part Number 1=587-6023-1-ND, Tolerance=20%, Voltage Rating=25V, Capacitance=10uF, Case/Package=0603, ComponentLink1Description=http://ds.yuden.co.jp/TYCOMPAS/ut/detail.do?productNo=TMK107BBJ106MA-T&fileName=TMK107BBJ106MA-T_SS&mode=specSheetDownload&src-supplier=Digi-Key, ComponentLink1URL=http://ds.yuden.co.jp/TYCOMPAS/ut/detail.do?productNo=TMK107BBJ106MA-T&fileName=TMK107BBJ106MA-T_SS&mode=specSheetDownload&src-supplier=Digi-Key, Lead Free="Lead Free", Manufacturer Part Number=TMK107BBJ106MA-T, Mount="Surface Mount", Packaging="Tape and Reel", Pricing 1="1=0.46, 10=0.32, 50=0.2238, 100=0.1918, 500=0.14386, 1000=0.12149 (USD)", RoHS Compliant=Yes, Stock 1=85333, Supplier 1=Digi-Key
C9: library part C1005X7R1H104KT000F, "CAP CER 0.1UF 50V X7R 0402", Dielectric=X7R, LCSC Part Number=C361198, Manufacturer=TDK, Tolerance=10%, Voltage=25V, Category="Ceramic Capacitors", ComponentLink1Description=LCSC, ComponentLink1URL=https://www.lcsc.com/product-detail/Multilayer-Ceramic-Capacitors-MLCC-SMD-SMT_TDK-C1005X7R1H104KT000F_C361198.html, Item Type=Capacitor, Manufacturer Part Number=C1005X7R1H104KT000F, RoHS=No, Supplier 1=Avnet, Supplier Part Number 1=C1005X7R1H104KT000F
C10 C24 C34: library part GRM033R61C105ME15D, "CAP CER 1UF 16V X5R 0201", LCSC Part Number=C335102, Manufacturer=Murata, Supplier Part Number 1=490-18654-1-ND, Category="Ceramic Capacitors", ComponentLink1Description=https://datasheet.octopart.com/GRM033R61C105ME15D-Murata-datasheet-155345049.pdf?src-supplier=Element14, ComponentLink1URL=https://datasheet.octopart.com/GRM033R61C105ME15D-Murata-datasheet-155345049.pdf?src-supplier=Element14, ComponentLink2Description=https://datasheet.octopart.com/GRM033R61C105ME15D-Murata-datasheet-165579666.pdf?src-supplier=TME, ComponentLink2URL=https://datasheet.octopart.com/GRM033R61C105ME15D-Murata-datasheet-165579666.pdf?src-supplier=TME, Item Type=Capacitor, Manufacturer Part Number=GRM033R61C105ME15D, Pricing 1="1=0.14, 10=0.098, 50=0.0554, 100=0.0459, 500=0.0322, 1000=0.02665, 2500=0.02481, 5000=0.0227 (USD)", RoHS=No, Stock 1=12823, Supplier 1=Digi-Key
C12: library part CL05A106MP5NUNC, "CAP CER 10UF 10V X5R 0402", Case Code (Imperial)=0402, Case Code (Metric)=1005, Dielectric=X5R, LCSC Part Number=C315248, Manufacturer=Samsung, Max Operating Temperature=85°C, Min Operating Temperature=-55°C, Package Quantity=1, Tolerance=20%, Voltage Rating=10V, Capacitance=10uF, Case/Package=0402, Category="Ceramic Capacitors", ComponentLink1Description=https://datasheet.ciiva.com/25721/cl05a106mp5nunc-25721584.pdf?src-supplier=Digi-Key, ComponentLink1URL=https://datasheet.ciiva.com/25721/cl05a106mp5nunc-25721584.pdf?src-supplier=Digi-Key, ComponentLink2Description=https://datasheet.ciiva.com/26838/getdatasheetpartid-745310-26838170.pdf?src-supplier=Verical, ComponentLink2URL=https://datasheet.ciiva.com/26838/getdatasheetpartid-745310-26838170.pdf?src-supplier=Verical, Construction=Flat, Contact Plating=Tin, Depth=0.5mm, Item Type=Capacitor, Lead Free="Lead Free", Length=1mm, Manufacturer Part Number=CL05A106MP5NUNC, Mount="Surface Mount", Packaging="Tape and Reel", Pricing 1="10000=0.02537 (USD)", Radiation Hardening=No, RoHS=Yes, RoHS Compliant=Yes, Series=CL, Stock 1=1729850, Supplier 1=Avnet, Supplier Part Number 1=CL05A106MP5NUNC, Termination=Wraparound, Thickness=0.028inch, Width=0.02inch
C17 C39 C40 C45: library part CL05A475MO5NUNC, "CAP CER 4.7UF 16V X5R 0402", Case Code (Imperial)=0402, Case Code (Metric)=1005, Manufacturer=Samsung, Max Operating Temperature=85°C, Min Operating Temperature=-55°C, Tolerance=20%, Voltage Rating=16V, Capacitance=4.7uF, Case/Package=0402, Category="Ceramic Capacitors", ComponentLink1Description=http://www.farnell.com/datasheets/2710653.pdf?src-supplier=Farnell, ComponentLink1URL=http://www.farnell.com/datasheets/2710653.pdf?src-supplier=Farnell, ComponentLink2Description=http://www.samsungsem.com/kr/support/product-search/mlcc/CL05A475MO5NUNC.jsp?src-supplier=Digikey, ComponentLink2URL=http://www.samsungsem.com/kr/support/product-search/mlcc/CL05A475MO5NUNC.jsp?src-supplier=Digikey, ComponentLink3Description=http://www.farnell.com/datasheets/2710653.pdf?src-supplier=Element14, ComponentLink3URL=http://www.farnell.com/datasheets/2710653.pdf?src-supplier=Element14, ComponentLink4Description=https://datasheet.octopart.com/CL05A475MO5NUNC-Samsung-Electro-Mechanics-datasheet-123102911.pdf?src-supplier=Future+Electronics, ComponentLink4URL=https://datasheet.octopart.com/CL05A475MO5NUNC-Samsung-Electro-Mechanics-datasheet-123102911.pdf?src-supplier=Future+Electronics, ComponentLink5Description=http://www.farnell.com/datasheets/2710653.pdf?src-supplier=Newark, ComponentLink5URL=http://www.farnell.com/datasheets/2710653.pdf?src-supplier=Newark, Height=550um, Length=0.039inch, Manufacturer Part Number=CL05A475MO5NUNC, Material=4241ConductorMaterial, Mount="Surface Mount", Packaging="Cut Tape", Pricing 1="10000=0.09712 (USD)", RoHS=Yes, RoHS Compliant=Yes, Series=CL, Stock 1=50000, Supplier 1=Avnet, Supplier Part Number 1=CL05A475MO5NUNC, Thickness=0.022inch, Voltage Rating (DC)=16V, Width=0.02inch
C18: library part VJ0402Y103JXXAC, "CAP CER 10000PF 25V X7R 0402", Capacitance=10nF, Case Code (Imperial)=0402, Case Code (Metric)=1005, Dielectric=X7R, LCSC Part Number=C2175851, Manufacturer="Vishay Vitramon", Max Operating Temperature=150°C, Min Operating Temperature=-55°C, Supplier Part Number 1=720-1897-2-ND, Tolerance=5%, Voltage Rating=25V, Case/Package=0402, ComponentLink1Description=http://www.vishay.com/docs/45199/vjcommercialseries.pdf?src-supplier=Digi-Key, ComponentLink1URL=http://www.vishay.com/docs/45199/vjcommercialseries.pdf?src-supplier=Digi-Key, ComponentLink2Description=http://www.mouser.com/ds/2/427/vjcommercialseries-222796.pdf?src-supplier=Mouser, ComponentLink2URL=http://www.mouser.com/ds/2/427/vjcommercialseries-222796.pdf?src-supplier=Mouser, ComponentLink3Description=http://www.vishay.com/docs/45199/commseri.pdf?src-supplier=Avnet, ComponentLink3URL=http://www.vishay.com/docs/45199/commseri.pdf?src-supplier=Avnet, ComponentLink4Description=http://components.arrow.com/part/dataview/3604811S5190749N4403?src-supplier=Arrow+Electronics, ComponentLink4URL=http://components.arrow.com/part/dataview/3604811S5190749N4403?src-supplier=Arrow+Electronics, ComponentLink5Description=http://components.arrow.com/part/dataview/0323_01555941?src-supplier=Arrow+Europe, ComponentLink5URL=http://components.arrow.com/part/dataview/0323_01555941?src-supplier=Arrow+Europe, ComponentLink6Description=http://www.onlinecomponents.com/datasheet/vj0402y103jxxac.aspx?p=35767938&src-supplier=Onlinecomponents.com, ComponentLink6URL=http://www.onlinecomponents.com/datasheet/vj0402y103jxxac.aspx?p=35767938&src-supplier=Onlinecomponents.com, ComponentLink7Description=http://www.vishay.com/docs/45040/autospec.pdf?src-supplier=Future+Electronics, ComponentLink7URL=http://www.vishay.com/docs/45040/autospec.pdf?src-supplier=Future+Electronics, ComponentLink8Description=http://www.vishay.com/docs/45199/commseri.pdf?src-supplier=Avnet+Europe, ComponentLink8URL=http://www.vishay.com/docs/45199/commseri.pdf?src-supplier=Avnet+Europe, Construction=Flat, Depth=0.5mm, Height=0.6mm, Item Type=Capacitor, Lead Free="Lead Free", Length=1mm, Manufacturer Part Number=VJ0402Y103JXXAC, Mount="Surface Mount", Number of Pins=2, Packaging="Tape and Reel", Pricing 1="5000=0.08639, 10000=0.08131, 15000=0.07877, 25000=0.07623, 50000=0.07115 (USD)", Radiation Hardening=No, RoHS Compliant=Yes, Series="VJ COMM", Stock 1=65000, Supplier 1=Digi-Key, Termination=SMD/SMT, Voltage Rating (DC)=25V, Width=0.5mm
C20 C22 C29: library part CC0201MRX5R6BB225, "CAP CER 2.2UF 10V X5R 0201", Case/Package=0201, LCSC Part Number=C2186869, Manufacturer=Yageo, Max Operating Temperature=85°C, Min Operating Temperature=-55°C, Supplier Part Number=603-CC0201MRX56BB225, Tolerance=20%, Voltage Rating=10V, Category="Ceramic Capacitors", ComponentLink1Description=https://www.yageo.com/upload/media/product/productsearch/datasheet/mlcc/UPY-GPHC_X5R_4V-to-50V_26.pdf?src-supplier=Digi-Key, ComponentLink1URL=https://www.yageo.com/upload/media/product/productsearch/datasheet/mlcc/UPY-GPHC_X5R_4V-to-50V_26.pdf?src-supplier=Digi-Key, Item Type=Capacitor, Manufacturer Part Number=CC0201MRX5R6BB225, Mounting Technology="Surface Mount", Packaging="Tape and Reel", Pricing="1=0.43, 10=0.294, 50=0.294, 100=0.176, 1000=0.112, 10000=0.091 (USD)", RoHS=Yes, RoHS Compliant=Yes, Series=CC, Stock=25553, Supplier=Mouser
C30 C31: library part CC0201FRNPO9BN300, "CAP CER 30PF 50V C0G/NPO 0201", LCSC Part Number=C541318, Manufacturer=Yageo, Item Type=Capacitors, Manufacturer Part Number=CC0201FRNPO9BN300, Pricing="1=0.1, 10=0.041, 100=0.0239, 1000=0.0152, 2500=0.01306, 5000=0.01178 (USD)", RoHS=No, Stock=25330, Supplier=Digikey
C36 C37: library part CC0402KRX7R9BB473, "CAP CER 0.047UF 50V X7R 0402", Case Code (Imperial)=0402, Case Code (Metric)=1005, Dielectric=1511DielectricType, LCSC Part Number=C272875, Manufacturer=Yageo, Max Operating Temperature=125°C, Min Operating Temperature=-55°C, Supplier Part Number=2095687, Temperature Coefficient=30ppm/°C, Tolerance=10%, Voltage Rating=50V, Case/Package=0402, Category="Ceramic Capacitors", ComponentLink1Description=https://datasheet.octopart.com/CC0402KRX7R9BB473-Yageo-datasheet-166511530.pdf?src-supplier=Future+Electronics, ComponentLink1URL=https://datasheet.octopart.com/CC0402KRX7R9BB473-Yageo-datasheet-166511530.pdf?src-supplier=Future+Electronics, ComponentLink2Description=http://www.yageo.com/documents/recent/UPY-GPHC_X7R_6.3V-to-50V_18.pdf?src-supplier=Digikey, ComponentLink2URL=http://www.yageo.com/documents/recent/UPY-GPHC_X7R_6.3V-to-50V_18.pdf?src-supplier=Digikey, ComponentLink3Description=https://datasheet.octopart.com/CC0402KRX7R9BB473-Yageo-datasheet-140260305.pdf?src-supplier=Newark, ComponentLink3URL=https://datasheet.octopart.com/CC0402KRX7R9BB473-Yageo-datasheet-140260305.pdf?src-supplier=Newark, Halogen Free=5694HalogenFree, Height=550um, Item Type=Capacitor, Lead Free=5697LeadFree, Length=0.039inch, Manufacturer Part Number=CC0402KRX7R9BB473, Material=4241ConductorMaterial, Mounting Technology="Surface Mount", Packaging="Tape and Reel", Pricing="10000=0.0044, 40000=0.0042, 100000=0.004, 150000=0.0041, 250000=0.0039, 400000=0.0037, 500000=0.0038 (USD)", RoHS=Yes, RoHS Compliant=Yes, Series=CC, Stock=1130000, Supplier="Future Electronics", Thickness=0.022inch, Voltage Rating (DC)=50V, Width=0.02inch
D+ D- TP1 TP2: "Test Point ON", Item Type="Test Point", Manufacturer Part Number="TEST POINT 0.5mm Dia"
J1: "Wire Connecting Pads", Item Type="SMD Pads", Manufacturer Part Number="4 Pin SMD Wire Connector"
J2: "Gold 1A Straight Policy 1mm 4P 3.9mm -40℃~+105℃ 2.3mm 1.27mm Brass Black Single Row 1x4P Plugin,P=1.27mm Pin Headers ROHS", LCSC Part Number=C41370736, Manufacturer=Megastar, Package=Plugin,P=1.27mm, ComponentLink1Description=LCSC, ComponentLink1URL=https://www.lcsc.com/product-detail/Pin-Headers_Megastar-ZX-PZ1-27-1-4PZZ_C41370736.html, Item Type=Header, Manufacturer Part Number=ZX-PZ1.27-1-4PZZ
L1: library part XFL4020-102MEC, "FIXED IND 1UH 11A 11.9MOHM SM", Case/Package=SMD/SMT, Inductance Tolerance=20%, LCSC Part Number=C5355380, Manufacturer=Coilcraft, Max DC Current=11A, Max Operating Temperature=125°C, Min Operating Temperature=-40°C, Saturation Current=4.5A, Self Resonant Frequency=64MHz, Supplier Part Number=994-XFL4020-102MEC, Test Frequency=100kHz, Category="Fixed Inductors", ComponentLink1Description=https://datasheet.ciiva.com/22679/1682010-22679273.pdf?src-supplier=Element14, ComponentLink1URL=https://datasheet.ciiva.com/22679/1682010-22679273.pdf?src-supplier=Element14, ComponentLink2Description=https://datasheet.ciiva.com/22679/1682010-22679274.pdf?src-supplier=Element14, ComponentLink2URL=https://datasheet.ciiva.com/22679/1682010-22679274.pdf?src-supplier=Element14, ComponentLink3Description=https://datasheet.ciiva.com/13168/xfl4020-13168079.pdf?src-supplier=Mouser, ComponentLink3URL=https://datasheet.ciiva.com/13168/xfl4020-13168079.pdf?src-supplier=Mouser, Core Material=Composite, ESR=11.9mR, Height=2.1mm, Item Type=Inductor, Lead Free="Contains Lead", Length=4.3mm, Manufacturer Part Number=XFL4020-102MEC, Mounting Technology="Surface Mount", Packaging="Tape and Reel", Pricing="1=2.68, 10=2.68, 50=2.68, 100=2.68, 1000=1.01, 10000=1.01 (USD)", Reach SVHC Compliant=No, RMS Current (Irms)=11A, RoHS=Yes, RoHS Compliant=Yes, Series=XFL4020, Shielding=Shielded, Stock=12821, Supplier=Mouser, Termination=SMD/SMT, Tolerance=20%, Width=4.3mm
L2: library part SLO252012F4R7MTT, "1.55A 4.7uH ±20% SMD Power Inductors ROHS", LCSC Part Number=C275675, Manufacturer="Sunltech Tech", Package=SMD, ComponentLink1Description=LCSC, ComponentLink1URL=https://www.lcsc.com/product-detail/Power-Inductors_Sunltech-Tech-SLO252012F4R7MTT_C275675.html, Item Type=Inductor, Manufacturer Part Number=SLO252012F4R7MTT
LED1: library part 16-213/GHC-YR1S1/3T, "Green 520~535nm 0402 Light Emitting Diodes (LED) RoHS", LCSC Part Number=C74338, Manufacturer="Everlight Elec", Package=0402, ComponentLink1Description=LCSC, ComponentLink1URL=https://www.lcsc.com/product-detail/Light-Emitting-Diodes-LED_Everlight-Elec-16-213-GHC-YR1S1-3T_C74338.html, Dominant Wavelength / Coordinate rank=520~535nm, Illumination Color=Green, Item Type=LED, Luminous Intensity (IF=20mA)=112~285mcd, Manufacturer Part Number=16-213/GHC-YR1S1/3T, Mounting Type="Surface Mount"
LS1: "80dB Passive (external drive) Electromagnetic Type 4kHz SMD,5x5mm Buzzers ROHS", LCSC Part Number=C391030, Manufacturer=FUET, Package=SMD,5x5mm, ComponentLink1Description=LCSC, ComponentLink1URL=https://www.lcsc.com/product-detail/Buzzers_FUET-FUET-5025_C391030.html, Item Type=Buzzers, Manufacturer Part Number=FUET-5025
Q1: "MOSFET N-CH 20V 1A DFN1006-3", Drain to Source Resistance=340mR, LCSC Part Number=C570828, Manufacturer=Rohm, ComponentLink1Description=http://www.mouser.com/ds/2/348/rv2c010un-e-1139137.pdf?src-supplier=Mouser, ComponentLink1URL=http://www.mouser.com/ds/2/348/rv2c010un-e-1139137.pdf?src-supplier=Mouser, ComponentLink2Description=http://www.farnell.com/datasheets/1945594.pdf?src-supplier=Farnell, ComponentLink2URL=http://www.farnell.com/datasheets/1945594.pdf?src-supplier=Farnell, ComponentLink3Description=https://www.rohm.com/datasheet/RV2C010UN/rv2c010un-e?src-supplier=Digikey, ComponentLink3URL=https://www.rohm.com/datasheet/RV2C010UN/rv2c010un-e?src-supplier=Digikey, ComponentLink4Description=http://rohmfs.rohm.com/en/techdata_basic/transistor/taping/VML1006_T2L_taping.pdf?src-supplier=Digikey, ComponentLink4URL=http://rohmfs.rohm.com/en/techdata_basic/transistor/taping/VML1006_T2L_taping.pdf?src-supplier=Digikey, ComponentLink5Description=http://rohmfs.rohm.com/en/products/databook/datasheet/discrete/transistor/mosfet/rv2c010unt2l.pdf?src-supplier=Avnet, ComponentLink5URL=http://rohmfs.rohm.com/en/products/databook/datasheet/discrete/transistor/mosfet/rv2c010unt2l.pdf?src-supplier=Avnet, ComponentLink6Description=https://datasheet.octopart.com/RV2C010UNT2L-Rohm-datasheet-57364635.pdf?src-supplier=Element14, ComponentLink6URL=https://datasheet.octopart.com/RV2C010UNT2L-Rohm-datasheet-57364635.pdf?src-supplier=Element14, Item Type=MOSFETs, Manufacturer Part Number=RV2C010UNT2L, Pricing="1=0.42, 10=0.261, 50=0.261, 100=0.123, 1000=0.086, 10000=0.073 (USD)", RoHS=Yes, Stock=16470, Supplier=Mouser
R1: library part RC0402FR-07100RL, "RES 100 OHM 1% 1/16W 0402", Case Code (Imperial)=0402, Case Code (Metric)=1005, LCSC Part Number=C106232, Manufacturer=Yageo, Max Operating Temperature=155°C, Max Power Dissipation=63mW, Min Operating Temperature=-55°C, Power Rating=62.5mW, Resistance Tolerance=1%, Resistor Type="Thick Film", Supplier Part Number 1=603-RC0402FR-07100RL, Temperature Coefficient=100ppm/°C, Voltage Rating=50V, Case/Package=0402, Category="Chip SMD Resistors", ComponentLink1Description=https://datasheet.ciiva.com/11808/0900766b80c66297-11808765.pdf?src-supplier=RSComponents, ComponentLink1URL=https://datasheet.ciiva.com/11808/0900766b80c66297-11808765.pdf?src-supplier=RSComponents, ComponentLink2Description=https://datasheet.ciiva.com/7849/1784430-7849810.pdf?src-supplier=Element14, ComponentLink2URL=https://datasheet.ciiva.com/7849/1784430-7849810.pdf?src-supplier=Element14, ComponentLink3Description=https://datasheet.ciiva.com/28367/1018594-28367226.pdf?src-supplier=Element14, ComponentLink3URL=https://datasheet.ciiva.com/28367/1018594-28367226.pdf?src-supplier=Element14, ComponentLink4Description=https://datasheet.ciiva.com/22747/1018594-22747511.pdf?src-supplier=Element14, ComponentLink4URL=https://datasheet.ciiva.com/22747/1018594-22747511.pdf?src-supplier=Element14, ComponentLink5Description=https://datasheet.ciiva.com/12667/pyu-rc0402-51-rohs-l-6-r-12667957.pdf?src-supplier=Mouser, ComponentLink5URL=https://datasheet.ciiva.com/12667/pyu-rc0402-51-rohs-l-6-r-12667957.pdf?src-supplier=Mouser, ComponentLink6Description=https://datasheet.ciiva.com/15189/getdatasheetpartid-329466-15189335.pdf?src-supplier=Verical, ComponentLink6URL=https://datasheet.ciiva.com/15189/getdatasheetpartid-329466-15189335.pdf?src-supplier=Verical, ComponentLink7Description=https://datasheet.ciiva.com/16740/pyu-rc0402-51-rohs-l-6-r-16740566.pdf?src-supplier=Future+Electronics, ComponentLink7URL=https://datasheet.ciiva.com/16740/pyu-rc0402-51-rohs-l-6-r-16740566.pdf?src-supplier=Future+Electronics, Construction=Rectangular, Depth=0.5mm, Features="Moisture Resistant", Height=0.32mm, Item Type=Resistor, Lead Free="Lead Free", Length=1mm, Manufacturer Part Number=RC0402FR-07100RL, Military Standard=Not, Number of Pins=2, Number of Terminations=2, Packaging="Tape and Reel", Pricing 1="1=0.10000, 10=0.01200, 50=0.01200, 100=0.00500, 1000=0.00300, 2500=0.00200, 10000=0.00100 (USD)", REACH SVHC="No SVHC", Resistance=100R, RoHS=Yes, RoHS Compliant=Yes, Series=RC, Size Code=0402, Stock 1=699545, Supplier 1=Mouser, Technology="THICK FILM", Termination=SMD/SMT, Tolerance=1%, Voltage Rating (DC)=50V, Width=0.5mm
R2 R3: library part RC0201FR-074K7L, "RES 4.7K OHM 1% 1/20W 0201", LCSC Part Number=C138135, Manufacturer=Yageo, Supplier Part Number=7537285, Category="Chip SMD Resistors", ComponentLink1Description=https://datasheet.ciiva.com/2493/pyu-r-int-thick-7-2493811.pdf?src-supplier=Digi-Key, ComponentLink1URL=https://datasheet.ciiva.com/2493/pyu-r-int-thick-7-2493811.pdf?src-supplier=Digi-Key, ComponentLink2Description=https://datasheet.ciiva.com/2493/pyu-r-int-thick-7-2493812.pdf?src-supplier=Digi-Key, ComponentLink2URL=https://datasheet.ciiva.com/2493/pyu-r-int-thick-7-2493812.pdf?src-supplier=Digi-Key, ComponentLink3Description=https://datasheet.ciiva.com/2493/pyu-r-int-thick-7-2493813.pdf?src-supplier=Digi-Key, ComponentLink3URL=https://datasheet.ciiva.com/2493/pyu-r-int-thick-7-2493813.pdf?src-supplier=Digi-Key, ComponentLink4Description=https://datasheet.ciiva.com/8892/pyu-rc0201-51-rohs-l-8-8892942.pdf?src-supplier=Avnet, ComponentLink4URL=https://datasheet.ciiva.com/8892/pyu-rc0201-51-rohs-l-8-8892942.pdf?src-supplier=Avnet, ComponentLink5Description=https://datasheet.ciiva.com/7672/1563626-7672233.pdf?src-supplier=Element14, ComponentLink5URL=https://datasheet.ciiva.com/7672/1563626-7672233.pdf?src-supplier=Element14, Item Type=Resistor, Manufacturer Part Number=RC0201FR-074K7L, Pricing="10000=0.0014, 50000=0.0013, 250000=0.0013, 750000=0.0012, 2000000=0.0011 (USD)", RoHS=Yes, Stock=1610000, Supplier="Future Electronics"
R4 R5 R16 R19 R20 R21 R22 R24 R25 R26 R28 R29: library part RC0201FR-0710KL, "RES SMD 10K OHM 1% 1/20W 0201", LCSC Part Number=C106225, Manufacturer=Yageo, Package=0201, ComponentLink7Description=LCSC, ComponentLink7URL=https://www.lcsc.com/product-detail/Chip-Resistor-Surface-Mount_YAGEO-RC0201FR-0710KL_C106225.html, Item Type=Resistor, Manufacturer Part Number=RC0201FR-0710KL
R6: library part RC0402FR-072K2L, "RES SMD 2.2K OHM 1% 1/16W 0402", Case Code (Imperial)=0402, Case Code (Metric)=1005, LCSC Part Number=C114762, Manufacturer=Yageo, Max Operating Temperature=155°C, Max Power Dissipation=63mW, Min Operating Temperature=-55°C, Resistance=2.2kR, Resistance Tolerance=1%, Resistor Type="Thick Film", Supplier Part Number 1=311-2.20KLRCT-ND, Temperature Coefficient=100ppm/°C, Voltage Rating=50V, Case/Package=0402, ComponentLink1Description=http://www.farnell.com/datasheets/2167052.pdf?src-supplier=Element14, ComponentLink1URL=http://www.farnell.com/datasheets/2167052.pdf?src-supplier=Element14, ComponentLink2Description=http://www.yageo.com/documents/recent/PYu-RC_Group_51_RoHS_L_9.pdf?src-supplier=Mouser, ComponentLink2URL=http://www.yageo.com/documents/recent/PYu-RC_Group_51_RoHS_L_9.pdf?src-supplier=Mouser, ComponentLink3Description=http://documents.rs-components.com/techlib://itc_doclist_GB.htm?stockno=6186532&src-supplier=RSComponents, ComponentLink3URL=http://documents.rs-components.com/techlib://itc_doclist_GB.htm?stockno=6186532&src-supplier=RSComponents, ComponentLink4Description=http://www.yageo.com/documents/recent/PYu-RC0402_51_RoHS_L_6_r.pdf?src-supplier=Future+Electronics, ComponentLink4URL=http://www.yageo.com/documents/recent/PYu-RC0402_51_RoHS_L_6_r.pdf?src-supplier=Future+Electronics, Construction=Rectangular, Depth=0.5mm, Features="Moisture Resistant", Height=0.35mm, Lead Free="Lead Free", Length=1mm, Manufacturer Part Number=RC0402FR-072K2L, Military Standard=Not, Number of Terminations=2, Packaging="Tape and Reel", Power Rating=63mW, Pricing 1="1=0.1, 10=0.016, 100=0.0066, 1000=0.00299, 2500=0.00259, 5000=0.00214 (USD)", REACH SVHC=Unknown, RoHS Compliant=Yes, Series=RC, Size Code=0402, Stock 1=966157, Supplier 1=Digi-Key, Technology="THICK FILM", Termination=SMD/SMT, Tolerance=1%, Weight=2.3E-05oz, Width=0.5mm
R7: library part RC0402FR-073KL, "RES 3K OHM 1% 1/16W 0402", Case Code (Imperial)=0402, Case Code (Metric)=1005, LCSC Part Number=C137987, Manufacturer=Yageo, Max Operating Temperature=155°C, Max Power Dissipation=63mW, Min Operating Temperature=-55°C, Package Quantity=1, Resistance Tolerance=1%, Resistor Type="Thick Film", Supplier Part Number=311-3KLRCT-ND, Temperature Coefficient=100ppm/°C, Voltage Rating=50V, Case/Package=0402, Category="Chip SMD Resistors", ComponentLink1Description=https://datasheet.ciiva.com/2553/pyu-r-int-thick-7-2553254.pdf?src-supplier=Digikey, ComponentLink1URL=https://datasheet.ciiva.com/2553/pyu-r-int-thick-7-2553254.pdf?src-supplier=Digikey, ComponentLink2Description=https://datasheet.ciiva.com/7849/1018594-7849992.pdf?src-supplier=Element14, ComponentLink2URL=https://datasheet.ciiva.com/7849/1018594-7849992.pdf?src-supplier=Element14, ComponentLink3Description=https://datasheet.ciiva.com/7849/1018594-7849991.pdf?src-supplier=Element14, ComponentLink3URL=https://datasheet.ciiva.com/7849/1018594-7849991.pdf?src-supplier=Element14, ComponentLink4Description=https://datasheet.ciiva.com/2553/pyu-r-int-thick-7-2553255.pdf?src-supplier=Digikey, ComponentLink4URL=https://datasheet.ciiva.com/2553/pyu-r-int-thick-7-2553255.pdf?src-supplier=Digikey, ComponentLink5Description=https://datasheet.ciiva.com/2553/pyu-r-int-thick-7-2553256.pdf?src-supplier=Digikey, ComponentLink5URL=https://datasheet.ciiva.com/2553/pyu-r-int-thick-7-2553256.pdf?src-supplier=Digikey, ComponentLink6Description=https://datasheet.ciiva.com/12666/pyu-rc0402-51-rohs-l-6-r-12666952.pdf?src-supplier=Mouser, ComponentLink6URL=https://datasheet.ciiva.com/12666/pyu-rc0402-51-rohs-l-6-r-12666952.pdf?src-supplier=Mouser, Construction=Rectangular, Depth=0.5mm, Features="Moisture Resistant", Height=0.016inch, Item Type=Resistor, Lead Free=5697LeadFree, Length=0.039inch, Manufacturer Part Number=RC0402FR-073KL, Military Standard=Not, Number of Terminations=2, Packaging="Tape and Reel", Power Rating=63mW, Pricing="1=0.1, 10=0.015, 50=0.0088, 100=0.0073, 500=0.00488, 1000=0.00417, 5000=0.00297 (USD)", Reach SVHC Compliant=Unknown, RoHS=Yes, RoHS Compliant=Yes, Series=RC, Stock=7013, Supplier=Digikey, Termination=SMD/SMT, Tolerance=1%, Voltage Rating (DC)=50V, Width=0.02inch
R8: library part RT0402BRD07137KL, "RES SMD 137K OHM 0.1% 1/16W 0402", Case/Package=0402, LCSC Part Number=C852519, Manufacturer=Yageo, Max Operating Temperature=155°C, Max Power Dissipation=63mW, Min Operating Temperature=-55°C, Temperature Coefficient=25ppm/°C, Tolerance=0.1%, Voltage Rating=50V, ComponentLink1Description=http://www.yageo.com/documents/recent/PYu-RT_1-to-0.01_RoHS_L_8.pdf?src-supplier=Digikey, ComponentLink1URL=http://www.yageo.com/documents/recent/PYu-RT_1-to-0.01_RoHS_L_8.pdf?src-supplier=Digikey, Features="Moisture Resistant", Height=0.014inch, Item Type=Resistors, Length=0.039inch, Manufacturer Part Number=RT0402BRD07137KL, Number of Terminations=2, Packaging="Tape and Reel", Pricing="1=0.2, 10=0.15, 50=0.1174, 100=0.1051, 500=0.07972, 1000=0.07035, 5000=0.05199 (USD)", RoHS=Yes, Series=RT, Stock=18830, Supplier=Digikey, Width=0.02inch
R9: library part RT0402BRD07100KL, "RES SMD 100K OHM 0.1% 1/16W 0402", LCSC Part Number=C852472, Manufacturer=Yageo, Supplier Part Number=YAG1343CT-ND, Voltage Rating (DC)=50V, Category="Chip SMD Resistors", ComponentLink1Description=https://datasheet.ciiva.com/12724/pyu-rt-1-to-0-05-rohs-l-4-12724954.pdf?src-supplier=Mouser, ComponentLink1URL=https://datasheet.ciiva.com/12724/pyu-rt-1-to-0-05-rohs-l-4-12724954.pdf?src-supplier=Mouser, Item Type=Resistor, Manufacturer Part Number=RT0402BRD07100KL, Pricing="1=0.16, 10=0.121, 50=0.0958, 100=0.0859, 500=0.0654, 1000=0.0578, 5000=0.04283 (USD)", RoHS=Yes, Stock=62932, Supplier=Digikey